# Altium PCB sheet4.PcbDoc (part 1 of 2)
Units mm, origin at the board's own origin, x right, y up, seen from the top; angles counter-clockwise.
Board outline 48.25 x 36 mm, 2 copper layers (Top Layer, Bottom Layer); 88 components, 96 nets, 433 pads, 91 vias.
Unrouted connection lines stored in the file: 251.
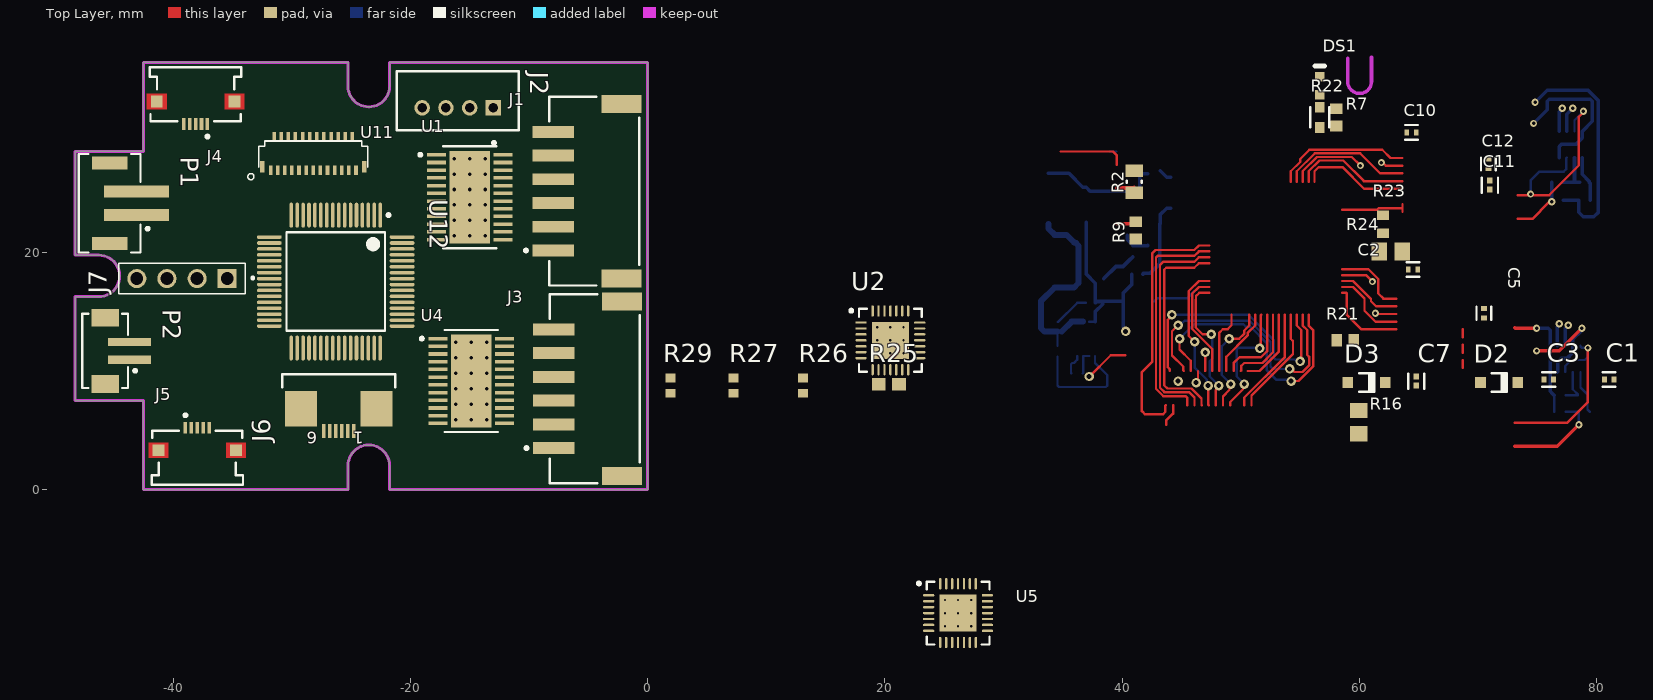
[diagram p0: Top Layer view]
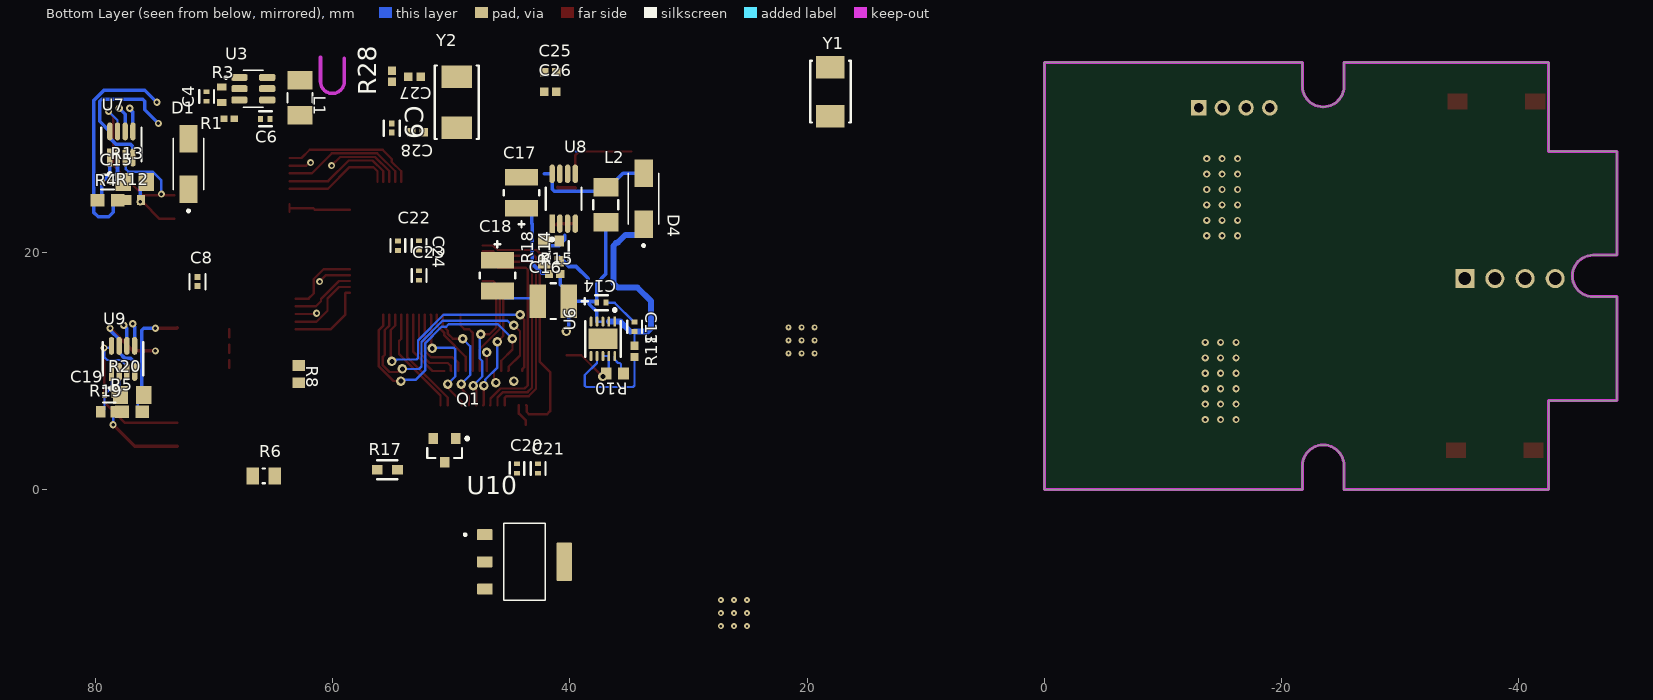
[diagram p1: Bottom Layer view, seen from below]

## Layer stack, top to bottom
Top Solder: solder mask 0.0102, Solder Resist, Dk 3.5
Top Layer: signal copper 0.0356
Dielectric 1: dielectric 0.32, FR-4, Dk 4.8
Bottom Layer: signal copper 0.0356
Bottom Solder: solder mask 0.0102, Solder Resist, Dk 3.5

## Board outline
-48.25,16.25 -46.25,16.25 ccw(c-46.25,18) -46.25,19.75 -48.25,19.75 -48.25,28.5 -42.5,28.5 -42.5,36 -25.25,36 -25.25,34 ccw(c-23.5,34) -21.75,34 -21.75,36 0,36 0,0 -21.75,0 -21.75,2 ccw(c-23.5,2) -25.25,2 -25.25,0 -42.5,0 -42.5,7.5 -48.25,7.5

## Design rules (kind name [scope] priority, off if disabled: settings)
Clearance [All] p1: gap=0.254 ignorepadtopadclearanceinfootprint=FALSE except(0: Arc-Hole Track-Hole SMDPad-Hole THPad-Hole Via-Hole Fill-Hole Poly-Hole Region-Hole Text-Hole)
MinimumSolderMaskSliver [All] p1 off: minsoldermaskwidth=0.254
PolygonConnect [All] p1: connectstyle=Relief reliefconductorwidth=0.254 reliefentries=4 polygonreliefangle="90 Angle" airgapwidth=0.254
RoutingVias [All] p1: holewidth=0.711 width=1.27 viastyle="Through Hole" minholewidth=0.711 minwidth=1.27 maxholewidth=0.711 maxwidth=1.27
SilkToSilkClearance [All] p1 off: silktosilkclearance=0.254
SilkToSolderMaskClearance [IsPad] p1 off: minsilkscreentomaskgap=0.254 clearancetoexposedcopper=TRUE
SolderMaskExpansion [All] p1: expansion=0.102 istentingtop=FALSE
Width [All] p1: maxlimit=0.254 minlimit=0.254 preferedwidth=0.254
27 further rules are at their usual default settings.

## Components (designator, comment, footprint, x,y, rotation, side; value= is the part's Value field where it differs from the comment)
C1 "GRM155R71C104KA88D" FP-GRM15-MFG 81.04,9.271 r0 top value=0.10μF
C2 "GRM155R71C104KA88D" FP-GRM15-MFG 64.516,18.542 r0 top value=0.10μF
C3 "GRM155R61A105KE15D" FP-GRM15-0_1-MFG 75.96,9.271 r0 top value=1uF
C4 "GRM155R71C104KA88D" FP-GRM15-MFG 70.612,33.128 r270 bottom value=0.10μF
C5 "GRM155R61A105KE15D" FP-GRM15-0_1-MFG 70.485,14.859 r270 top value=1uF
C6 "GRM155R71C104KA88D" FP-GRM15-MFG 65.659,31.242 r180 bottom value=0.10μF
C7 "GRM155R71E473KA88D" FP-GRM155-0_05-IPC_C 64.784,9.144 r90 top
C8 "GRM155R71E473KA88D" FP-GRM155-0_05-IPC_C 71.374,17.524 r90 bottom
C9 "GRM155R71E473KA88D" FP-GRM155-0_05-IPC_C 54.991,30.461 r90 bottom
C10 "GRM155R71C104KA88D" FP-GRM15-MFG 64.389,30.099 r180 top value=0.10μF
C11 "GRM155R71E473KA88D" FP-GRM155-0_05-IPC_C 70.993,25.654 r270 top
C12 "GRM155R71C104KA88D" FP-GRM15-MFG 70.866,27.43 r90 top value=0.10μF
C13 "GRM155R71C104KA88D" FP-GRM15-MFG 34.544,13.716 r270 bottom value=0.10μF
C14 "GRM155R71C104KA88D" FP-GRM15-MFG 37.338,15.748 r0 bottom value=0.10μF
C15 "GRM155R71C104KA88D" FP-GRM15-MFG 78.975,25.908 r0 bottom value=0.10μF
C16 "TAJB336K010RNJ" FP-TAJB-MFG 41.402,15.875 r180 bottom
C17 "TAJB336K010RNJ" FP-TAJB-MFG 44.069,25.019 r270 bottom
C18 "TAJB336K010RNJ" FP-TAJB-MFG 46.101,18.034 r90 bottom
C19 "GRM155R71C104KA88D" FP-GRM15-MFG 78.815,7.958 r0 bottom value=0.10μF
C20 "GRM155R71C104KA88D" FP-GRM15-MFG 44.45,1.778 r90 bottom value=0.10μF
C21 "GRM155R71C104KA88D" FP-GRM15-MFG 42.672,1.778 r90 bottom value=0.10μF
C22 "GRM155R71C104KA88D" FP-GRM15-MFG 54.483,20.555 r90 bottom value=0.10μF
C23 "GRM155R71C104KA88D" FP-GRM15-MFG 52.705,18.034 r90 bottom value=0.10μF
C24 "GRM155R71C104KA88D" FP-GRM15-MFG 52.705,20.574 r90 bottom value=0.10μF
C25 "CC0402JRNPO9BN220" CAPC1005X55X25ML05T05 41.656,35.179 r180 bottom
C26 "CC0402JRNPO9BN220" CAPC1005X55X25ML05T05 41.656,33.528 r180 bottom
C27 "CC0402JRNPO9BN220" CAPC1005X55X25ML05T05 53.086,34.798 r180 bottom
C28 "CC0402JRNPO9BN220" CAPC1005X55X25ML05T05 52.834,30.099 r180 bottom
D1 "1SMB5918BT3G" DIOM5226X220N 72.136,27.432 r90 bottom
D2 "1N4148W-7-F" DIOD-SOD123-2_V 71.769,9.017 r0 top
D3 "1N4148W-7-F" DIOD-SOD123-2_V 60.593,9.017 r0 top
D4 "1SMB5918BT3G" DIOM5226X220N 33.782,24.511 r90 bottom
DS1 "HSMH-C190" AVAG-HSMX-C190_V 56.642,34.036 r90 top
J1 "S6B-PH-SM4-TB(LF)(SN)" JST-S6B-PH-SM4-TB(LF)(SN)_V -5.08,25.146 r90 top
J2 "440054-4" FP-440054-4-MFG -16.002,32.766 r0 top
J3 "S6B-PH-SM4-TB(LF)(SN)" JST-S6B-PH-SM4-TB(LF)(SN)_V -5.034,8.493 r90 top
J4 "54548-0571" MOLX-54548-0571 -38.1,31.75 r180 top
J5 "54548-0571" MOLX-54548-0571 -37.957,4.257 r0 top
J6 "68710614522" 68710614522 -26.035,7.493 r180 top
J7 "PPTC041LFBN-RC" SULLINS_PPTC041LFBN-RC -39.243,17.78 r180 top
L1 "LB3218T220K" FP-LB3218-1_8-0_2-IPC_A 62.738,33.02 r270 bottom
L2 "LB3218T220K" FP-LB3218-1_8-0_2-IPC_A 36.957,24.003 r90 bottom
P1 "620302124022" 620302124022 -45.339,24.13 r270 top
P2 "679302124022" 679302124022 -45.72,11.684 r270 top
Q1 "NSS40201LT1G" ONSC-SOT-23-3-318-08_V 50.546,3.302 r270 bottom
R1 "RC0402FR-075K1L" RESC1005X40X25NL05T10 68.707,31.242 r0 bottom
R2 "CRCW08055K00FKTA" RESC2013X50X30NL20T20 41.021,25.941 r90 top
R3 "RC0603FR-072K7L" RESC1608X55X25LL10T15 69.342,33.274 r270 bottom
R4 "ERJ-3EKF3300V" RESC1608X55X30ML15T15#1 78.961,24.384 r180 bottom
R5 "ERJ-3EKF3300V" RESC1608X55X30ML15T15#1 76.891,6.561 r0 bottom
R6 "CRCW08055K00FKTA" RESC2013X50X30NL20T20 65.786,1.143 r180 bottom
R7 "ERJ-3EKF1501V" RESC1608X55X30ML15T15#2 58.039,31.369 r270 top
R8 "ERJ-3EKF1501V" RESC1608X55X30ML15T15#2 62.859,9.727 r270 bottom
R9 "ERJ-3EKF1501V" RESC1608X55X30ML15T15#2 41.148,21.844 r90 top
R10 "ERJ-3EKF1501V" RESC1608X55X30ML15T15#2 36.195,9.779 r180 bottom
R11 "MCMR04X300 JTL" RESC1005X40X25ML05T10 34.544,11.651 r90 bottom
R12 "CRCW06036K20JNEA" RESC1609X50X30LL10T20 76.708,24.384 r0 bottom
R13 "TNPW080510R0FEEA" RESC2013X55X40ML15T20 76.675,25.908 r180 bottom
R14 "RL0603FR-070R1L" FP-RL0603-0_55-MFG 40.894,20.099 r270 bottom
R15 "MCMR04X300 JTL" RESC1005X40X25ML05T10 41.275,18.161 r180 bottom
R16 "TNPW080510R0FEEA" RESC2013X55X40ML15T20 59.944,5.682 r90 top
R17 "RL0603FR-070R1L" FP-RL0603-0_55-MFG 55.372,1.651 r180 bottom
R18 "ERJ-3EKF3300V" RESC1608X55X30ML15T15#1 42.164,20.066 r90 bottom
R19 "CRCW0603300KFKEA" RESC1609X50X30NL10T20 78.923,6.561 r180 bottom
R20 "TNPW080510R0FEEA" RESC2013X55X40ML15T20 76.891,7.958 r180 bottom
R21 "ERJ-3EKF1003V" RESC1608X55X30ML15T15#2 58.801,12.573 r180 top
R22 "RL0603FR-070R1L" FP-RL0603-0_55-MFG 56.642,31.369 r90 top
R23 "RC0603FR-07100RL" RESC1608X55X25ML10T15 61.976,22.352 r270 top
R24 "TNPW080510R0FEEA" RESC2013X55X40ML15T20 62.644,20.066 r0 top
R25 "ERJ-3EKF3300V" RESC1608X55X30ML15T15#1 20.334,8.89 r0 top
R26 "ERJ3EKF1002V" RESC1609X55X30LL15T15 13.095,8.763 r90 top
R27 "ERJ3EKF1002V" RESC1609X55X30LL15T15 7.253,8.763 r90 top
R28 "MCMR04X300 JTL" RESC1005X40X25ML05T10 54.991,34.831 r90 bottom
R29 "ERJ3EKF1002V" RESC1609X55X30LL15T15 1.919,8.763 r90 top
U1 "DRV8873HPWPRQ1" FP-PWP0024J-MFG -14.986,24.638 r0 top
U2 "CP2102-GMR" SLAB-QFN-28-3125x3125TP_M 20.461,12.573 r0 top
U3 "MT3608" SOT95P280X145-6N 66.675,33.782 r180 bottom
U4 "DRV8873HPWPRQ1" FP-PWP0024J-MFG -14.859,9.144 r0 top
U5 "CP2102-GMR" SLAB-QFN-28-3125x3125TP_M 26.162,-10.414 r0 top
U6 "MCP73213-A6SI/MF" FP-C04-063-IPC_B 37.211,12.7 r270 bottom
U7 "INA219AIDCNR" FP-DCN0008A-IPC_B 77.795,29.079 r90 bottom
U8 "LM2623AMM/NOPB" FP-DGK0008A-IPC_B 40.513,24.511 r90 bottom
U9 "INA219AIDCNR" FP-DCN0008A-IPC_B 77.653,11.006 r90 bottom
U10 "AMS1117-3.3" SOT229P700X180-4N 43.815,-6.096 r180 bottom
U11 "" "25pin 0.3mm connector" -28.181,28.361 r0 top
U12 "STM32F103RCT7" STM-LQFP64_M -26.289,17.526 r270 top
Y1 "ABM3-8.000MHZ-D2Y-T" FP-ABM3-MFG 18.034,33.528 r90 bottom
Y2 "ABM7-32.000MHZ-D2Y-T" FP-ABM7-MFG 49.53,32.639 r90 bottom

## Footprints (in the part's own frame and the unit in brackets; to place one, negate y for a bottom-side part, rotate by r counter-clockwise, add the part's x,y. Pads: shape width x height; smd on the part's side, far side on the other; paste and mask are expansions set on the pad)
"25pin 0.3mm connector" [mm]
  rect 0.3x0.8 smd: 1(-3.6,-1.437) 3(-3,-1.437) 5(-2.4,-1.437) 7(-1.8,-1.437) 9(-1.2,-1.437) 11(-0.6,-1.437) 13(0,-1.437) 15(0.6,-1.437) 17(1.2,-1.437) 19(1.8,-1.437) 21(2.4,-1.437) 23(3,-1.437) 25(3.6,-1.437)
  rect 0.3x0.65 smd: 2(-3.3,1.438) 4(-2.7,1.438) 6(-2.1,1.438) 8(-1.5,1.438) 10(-0.9,1.438) 12(-0.3,1.438) 14(0.3,1.438) 16(0.9,1.438) 18(1.5,1.438) 20(2.1,1.438) 22(2.7,1.438) 24(3.3,1.438)
  rect 0.4x0.95 smd: P1(-4.3,-1.162) P2(4.3,-1.162)
  silkscreen extent -5.52,-2.25 4.6,1.01
68710614522 [mm] "ZIF Connectors, Horizontal, Bottom Contact, pitch 0.5mm, 6p"
  rect 0.3x1.2 smd: 1(-1.25,2.56) 2(-0.75,2.56) 3(-0.25,2.56) 4(0.25,2.56) 5(0.75,2.56) 6(1.25,2.56)
  rect 2.7x3 smd: MP1(-3.18,0.7) MP2(3.18,0.7)
  silkscreen extent -4.77,-2.22 4.77,-1.12, body extent -4.7,-2.15 4.7,2.95, height 2.1
620302124022 [mm] "2.00mm SMT Male Vertical Shrouded Header, 2p"
  rect 1x5.5 smd: 1(1,2.25) 2(-1,2.25)
  rect 1.1x3 smd: MP1(-3.4,0) MP2(3.4,0)
  silkscreen extent -4.15,-2.6 4.15,3.32, body extent -4,-2.5 4,4.51, height 6.77
679302124022 [mm] "1.50mm SMT Male Vertical Shrouded Header, 2p"
  rect 0.7x3.6 smd: 1(0.75,2.05) 2(-0.75,2.05)
  rect 1.5x2.3 smd: MP1(-2.8,0) MP2(2.8,0)
  silkscreen extent -3.13,-1.92 3.13,2.65, body extent -3,-1.85 3,3.35, height 5.49
AVAG-HSMX-C190_V [mm] "SMD, 2-Leads, Body 1.6x0.8mm, Height 0.9mm"
  rect 0.8x0.8 smd: 1(-0.75,0) 2(0.75,0)
  silkscreen extent 1.65,-0.4 1.65,0.4, body extent -0.8,-0.4 0.8,0.4, height 0.9
CAPC1005X55X25ML05T05 [mm] "Chip Capacitor, 2-Leads, Body 1.00x0.50mm, IPC Low Density"
  rect 0.72x0.72 smd: 1(-0.51,0) 2(0.51,0)
  body extent -0.53,-0.28 0.53,0.27, height 0.55
DIOD-SOD123-2_V [mm] "SOD123, 2-Leads, Body 2.7x1.55mm, Height 1.45mm"
  rect 0.9x0.95 smd: 1(-1.575,0) 2(1.575,0)
  silkscreen extent -0.64,-0.82 0.64,0.77, body extent -1.35,-0.77 1.35,0.77, height 1.45
DIOM5226X220N [mm]
  rect 2.32x1.55 smd: A(2.14,0) C(-2.14,0)
  silkscreen extent -4.05,-1.3 2.16,1.3
FP-440054-4-MFG [mm]
  rect 1.3x1.3 hole 0.8 paste-1000 mask+0: 1(3,-0.6)
  round 1.3 hole 0.8 paste-1000 mask+0: 2(1,-0.6) 3(-1,-0.6) 4(-3,-0.6)
  silkscreen extent -5.15,-3.67 5.15,2.5, body extent -5.25,-2.6 5.25,2.6, height 0.25
FP-ABM3-MFG [mm]
  rect 1.9x2.4 smd paste+0 mask+0: 1(-2.05,0) 2(2.05,0)
  silkscreen extent -2.6,-1.7 2.6,1.7, body extent -2.5,-1.6 2.5,1.6, height 1.3
FP-ABM7-MFG [mm]
  rect 1.9x2.6 smd paste+0 mask+0: 1(-2.15,0) 2(2.15,0)
  silkscreen extent -3.1,-1.85 3.1,1.85, body extent -3,-1.75 3,1.75, height 1.4
FP-C04-063-IPC_B [mm]
  rect 0.854x0.239 smd paste+0 mask+0: 1(-1.452,1)
  rrect100% 0.854x0.239 smd paste+0 mask+0: 2(-1.452,0.5) 3(-1.452,0) 4(-1.452,-0.5) 5(-1.452,-1) 6(1.452,-1) 7(1.452,-0.5) 8(1.452,0) 9(1.452,0.5) 10(1.452,1)
  rect 1.75x2.45 smd paste-1000 mask+0: 11(0,0)
  silkscreen extent -2.55,-1.5 1.5,1.5
FP-DCN0008A-IPC_B [mm]
  rect 1.505x0.455 smd paste+0 mask+0: 1(-1.1,0.975)
  rrect100% 1.505x0.455 smd paste+0 mask+0: 2(-1.1,0.325) 3(-1.1,-0.325) 4(-1.1,-0.975) 5(1.1,-0.975) 6(1.1,-0.325) 7(1.1,0.325) 8(1.1,0.975)
  silkscreen extent -2.62,-1.7 1.4,1.7, body extent -1.4,-1.45 1.4,1.45, height 1.45
FP-DGK0008A-IPC_B [mm]
  rect 1.557x0.458 smd paste+0 mask+0: 1(-2.101,0.975)
  rrect100% 1.557x0.458 smd paste+0 mask+0: 2(-2.101,0.325) 3(-2.101,-0.325) 4(-2.101,-0.975) 5(2.101,-0.975) 6(2.101,-0.325) 7(2.101,0.325) 8(2.101,0.975)
  silkscreen extent -3.55,-1.5 0.95,1.5, body extent -2.45,-1.5 2.45,1.5, height 1.1
FP-GRM15-0_1-MFG [mm]
  rect 0.4x0.5 smd paste+0 mask+0: 1(-0.4,0) 2(0.4,0)
  silkscreen extent -0.55,-0.63 0.55,0.63, body extent -0.7,-0.38 0.7,0.38, height 0.25
FP-GRM15-MFG [mm]
  rect 0.4x0.5 smd paste+0 mask+0: 1(-0.4,0) 2(0.4,0)
  silkscreen extent -0.53,-0.63 0.53,0.63, body extent -0.7,-0.38 0.7,0.38, height 0.25
FP-GRM155-0_05-IPC_C [mm]
  rect 0.515x0.472 smd paste+0 mask+0: 1(-0.379,0) 2(0.379,0)
  silkscreen extent -0.64,-0.67 0.64,0.67, body extent -0.74,-0.38 0.74,0.38, height 0.25
FP-LB3218-1_8-0_2-IPC_A [mm]
  rect 1.555x2.106 smd paste+0 mask+0: 1(-1.476,0) 2(1.476,0)
  silkscreen extent -0.4,-1.05 0.4,1.05, body extent -1.6,-0.9 1.6,0.9, height 2
FP-PWP0024J-MFG [mm]
  rect 1.6x0.3 smd paste-1000 mask+0: 1(-2.8,3.575) 2(-2.8,2.925) 3(-2.8,2.275) 4(-2.8,1.625) 5(-2.8,0.975) 6(-2.8,0.325) 7(-2.8,-0.325) 8(-2.8,-0.975) 9(-2.8,-1.625) 10(-2.8,-2.275) 11(-2.8,-2.925) 12(-2.8,-3.575) 13(2.8,-3.575) 14(2.8,-2.925) 15(2.8,-2.275) 16(2.8,-1.625) 17(2.8,-0.975) 18(2.8,-0.325) 19(2.8,0.325) 20(2.8,0.975) 21(2.8,1.625) 22(2.8,2.275) 23(2.8,2.925) 24(2.8,3.575)
  rect 3.4x7.8 smd paste-1000 mask-1000: 25(0,0)
  silkscreen extent -4.3,-4.3 2.25,4.3, body extent -3.7,-4.2 3.7,4.2, height 0.25
FP-RL0603-0_55-MFG [mm]
  rect 0.9x0.8 smd paste+0 mask+0: 1(-0.85,0) 2(0.85,0)
  silkscreen extent -0.85,-0.8 0.85,0.8, body extent -0.8,-0.4 0.8,0.4, height 0.55
FP-TAJB-MFG [mm]
  rect 1.4x2.8 smd paste+0 mask+0: 1(-1.3,0) 2(1.3,0)
  silkscreen extent -0.23,-1.5 2.9,1.5, body extent -1.75,-1.4 1.75,1.4, height 2.1
JST-S6B-PH-SM4-TB(LF)(SN)_V [mm] "SMD, 2-Leads, Body 15.9x7.6mm, Pitch 2mm"
  rect 1x3.5 smd: 1(-5,2.875) 2(-3,2.875) 3(-1,2.875) 4(1,2.875) 5(3,2.875) 6(5,2.875)
  rect 1.5x3.4 smd: MP1(-7.35,-2.875) MP2(7.35,-2.875)
  silkscreen extent -7.95,-4.37 7.95,5.3, body extent -7.95,-4.37 7.95,4.23, height 5.6
MOLX-54548-0571 [mm] "FPC Connector, 5-Leads, Right Angle, Pitch 0.5 mm, Mated Height 1.2 mm, SMT"
  rect 0.3x1 smd: 1(-1,0.95) 2(-0.5,0.95) 3(0,0.95) 4(0.5,0.95) 5(1,0.95)
  rect 1x1 smd: MP1(-3.275,-0.95) MP2(3.275,-0.95)
  Top Layer region: 4.1,-0.3 2.45,-0.3 2.45,-1.6 4.1,-1.6
  Top Layer region: -4.1,-0.3 -2.45,-0.3 -2.45,-1.6 -4.1,-1.6
  silkscreen extent -3.85,-3.85 3.85,2.13, body extent -3.85,-3.85 3.85,1.15, height 1.21
ONSC-SOT-23-3-318-08_V [mm] "SOT23, 3-Leads, Body 2.92x1.3mm, Pitch 0.95mm"
  rect 0.9x0.8 smd: 1(-1,0.95) 2(-1,-0.95) 3(1,0)
  silkscreen extent -1.12,-1.46 0.65,2.02, body extent -0.65,-1.46 0.65,1.46, height 1.11
RESC1005X40X25ML05T10 [mm] "Chip Resistor, 2-Leads, Body 1.00x0.50mm, IPC Low Density"
  rect 0.7x0.65 smd: 1(-0.475,0) 2(0.475,0)
  body extent -0.53,-0.27 0.53,0.28, height 0.4
RESC1005X40X25NL05T10 [mm] "Chip Resistor, 2-Leads, Body 1.00x0.50mm, IPC Medium Density"
  rect 0.6x0.55 smd: 1(-0.425,0) 2(0.425,0)
  body extent -0.53,-0.27 0.53,0.28, height 0.4
RESC1608X55X25LL10T15 [mm] "Chip Resistor, 2-Leads, Body 1.60x0.80mm, IPC High Density"
  rect 0.6x0.8 smd: 1(-0.65,0) 2(0.65,0)
  body extent -0.85,-0.45 0.85,0.45, height 0.55
RESC1608X55X25ML10T15 [mm] "Chip Resistor, 2-Leads, Body 1.60x0.80mm, IPC Low Density"
  rect 0.8x1 smd: 1(-0.75,0) 2(0.75,0)
  body extent -0.85,-0.45 0.85,0.45, height 0.55
RESC1608X55X30ML15T15#1 [mm] "Chip Resistor, 2-Leads, Body 1.75x0.95mm, IPC Low Density"
  rect 1.15x1.05 smd: 1(-0.85,0) 2(0.85,0)
  body extent -0.87,-0.48 0.87,0.48, height 0.55
RESC1608X55X30ML15T15#2 [mm] "Chip Resistor, 2-Leads, Body 1.60x0.80mm, IPC Low Density"
  rect 0.9x1.05 smd: 1(-0.725,0) 2(0.725,0)
  body extent -0.87,-0.48 0.87,0.48, height 0.55
RESC1609X50X30LL10T20 [mm] "Chip Resistor, 2-Leads, Body 1.55x0.85mm, IPC High Density"
  rect 0.7x0.85 smd: 1(-0.575,0) 2(0.575,0)
  body extent -0.82,-0.48 0.82,0.48, height 0.5
RESC1609X50X30NL10T20 [mm] "Chip Resistor, 2-Leads, Body 1.55x0.85mm, IPC Medium Density"
  rect 0.8x0.95 smd: 1(-0.625,0) 2(0.625,0)
  body extent -0.82,-0.48 0.82,0.48, height 0.5
RESC1609X55X30LL15T15 [mm] "Chip Resistor, 2-Leads, Body 1.75x0.95mm, IPC High Density"
  rect 0.75x0.85 smd: 1(-0.65,0) 2(0.65,0)
  body extent -0.87,-0.48 0.87,0.48, height 0.55
RESC2013X50X30NL20T20 [mm] "Chip Resistor, 2-Leads, Body 2.00x1.25mm, IPC Medium Density"
  rect 1.05x1.45 smd: 1(-0.925,0) 2(0.925,0)
  silkscreen extent -0.1,-0.63 0.1,0.63, body extent -1.1,-0.72 1.1,0.72, height 0.5
RESC2013X55X40ML15T20 [mm] "Chip Resistor, 2-Leads, Body 2.00x1.25mm, IPC Low Density"
  rect 1.3x1.5 smd: 1(-0.975,0) 2(0.975,0)
  body extent -1.07,-0.7 1.08,0.7, height 0.55
SLAB-QFN-28-3125x3125TP_M [mm] "QFN, 28-Leads, Body 5x5mm, Pitch 0.5mm, Thermal Pad 3.13x3.13mm, IPC Low Density"
  oval 0.95x0.2 smd: 1(-2.475,1.5) 2(-2.475,1) 3(-2.475,0.5) 4(-2.475,0) 5(-2.475,-0.5) 6(-2.475,-1) 7(-2.475,-1.5) 15(2.475,-1.5) 16(2.475,-1) 17(2.475,-0.5) 18(2.475,0) 19(2.475,0.5) 20(2.475,1) 21(2.475,1.5)
  oval 0.2x0.95 smd: 8(-1.5,-2.475) 9(-1,-2.475) 10(-0.5,-2.475) 11(0,-2.475) 12(0.5,-2.475) 13(1,-2.475) 14(1.5,-2.475) 22(1.5,2.475) 23(1,2.475) 24(0.5,2.475) 25(0,2.475) 26(-0.5,2.475) 27(-1,2.475) 28(-1.5,2.475)
  rect 3.13x3.13 smd: 29(0,0)
  silkscreen extent -3.42,-2.65 2.65,2.65, body extent -2.5,-2.5 2.5,2.5, height 1
SOT95P280X145-6N [mm]
  rrect50% 1.37x0.59 smd: 1(-1.17,0.95) 2(-1.17,0) 3(-1.17,-0.95) 4(1.17,-0.95) 5(1.17,0) 6(1.17,0.95)
  silkscreen extent -2.4,-1.57 0.85,1.57, body extent -1.45,-1.4 1.45,1.4, height 1.45
SOT229P700X180-4N [mm]
  rrect15% 1.31x0.93 smd: 1(-3.345,2.29) 2(-3.345,0) 3(-3.345,-2.29)
  rrect15% 1.31x3.24 smd: 4(3.345,0)
  silkscreen extent -5.1,-3.25 1.75,3.25, body extent -3.5,-3.25 3.5,3.25, height 1.8
STM-LQFP64_M [mm] "Thin QFP, 64-Leads, Body 10x10mm, Pitch 0.5mm, IPC Low Density"
  oval 2.1x0.3 smd: 1(-5.6,3.75) 2(-5.6,3.25) 3(-5.6,2.75) 4(-5.6,2.25) 5(-5.6,1.75) 6(-5.6,1.25) 7(-5.6,0.75) 8(-5.6,0.25) 9(-5.6,-0.25) 10(-5.6,-0.75) 11(-5.6,-1.25) 12(-5.6,-1.75) 13(-5.6,-2.25) 14(-5.6,-2.75) 15(-5.6,-3.25) 16(-5.6,-3.75) 33(5.6,-3.75) 34(5.6,-3.25) 35(5.6,-2.75) 36(5.6,-2.25) 37(5.6,-1.75) 38(5.6,-1.25) 39(5.6,-0.75) 40(5.6,-0.25) 41(5.6,0.25) 42(5.6,0.75) 43(5.6,1.25) 44(5.6,1.75) 45(5.6,2.25) 46(5.6,2.75) 47(5.6,3.25) 48(5.6,3.75)
  oval 0.3x2.1 smd: 17(-3.75,-5.6) 18(-3.25,-5.6) 19(-2.75,-5.6) 20(-2.25,-5.6) 21(-1.75,-5.6) 22(-1.25,-5.6) 23(-0.75,-5.6) 24(-0.25,-5.6) 25(0.25,-5.6) 26(0.75,-5.6) 27(1.25,-5.6) 28(1.75,-5.6) 29(2.25,-5.6) 30(2.75,-5.6) 31(3.25,-5.6) 32(3.75,-5.6) 49(3.75,5.6) 50(3.25,5.6) 51(2.75,5.6) 52(2.25,5.6) 53(1.75,5.6) 54(1.25,5.6) 55(0.75,5.6) 56(0.25,5.6) 57(-0.25,5.6) 58(-0.75,5.6) 59(-1.25,5.6) 60(-1.75,5.6) 61(-2.25,5.6) 62(-2.75,5.6) 63(-3.25,5.6) 64(-3.75,5.6)
  silkscreen extent -5.72,-4.15 4.15,4.58, body extent -5,-5 5,5, height 1.6
SULLINS_PPTC041LFBN-RC [mm]
  rect 1.605x1.605 / inner round 1.605 / far side rect 1.605x1.605 hole 1.07: 1(-3.81,0)
  round 1.605 hole 1.07: 2(-1.27,0) 3(1.27,0) 4(3.81,0)
  silkscreen extent -6.06,-1.27 5.33,1.27, body extent -5.33,-1.27 5.33,1.27, height 8.51

## Part data
C1 C2 C4 C6 C10 C12 C13 C14 C15 C19 C20 C21 C22 C23 C24: library part CMP-2100-03641-2, "CAP CER 0.1UF 16V X7R 0402", Capacitance=0.10μF, Manufacturer=Murata, Package=GRM15, Temperature="-55°C to +125°C", Temperature Characteristic=X7R, Temperature Range High=+125°C, Temperature Range Low=-55°C, Tolerance=10%, Voltage Rating=16Vdc, Category=Cap, ComponentLink2Description=Datasheet, ComponentLink2URL=https://search.murata.co.jp/Ceramy/image/img/A01X/G101/ENG/GRM155R71H471KA01-01A.pdf, Device Class L1="Passive Components", Device Class L2=Capacitors, Device Class L3="Ceramic Capacitors", Digikey Description="CAP CER 0.1UF 16V X7R 0402", Height=0.55mm, Ipc Land Pattern Name=CAPC10050X219, Lead Free=yes, Manufacturer Part Number=GRM155R71C104KA88D, Material=Ceramic, Mouser Description="0402 0.1 uF 16V ±10 % Tolerance X7R SMT Multilayer Ceramic Capacitor", Octopart=https://octopart.com/grm155r71c104ka88d-murata-196880, RoHS=TRUE, Standoff Height=0mm
C3 C5: library part CMP-2008-04556-2, "CAP CER 1UF 10V X5R 0402", Capacitance=1uF, Manufacturer=Murata, Package=GRM15-0.1, Temperature="-55°C to +85°C", Temperature Characteristic=X5R, Temperature Coefficient=15%, Temperature Range High=+85°C, Temperature Range Low=-55°C, Tolerance=10%, Voltage Rating=10V, Automotive=No, Category=Cap, ComponentLink2Description=Datasheet, ComponentLink2URL=https://search.murata.co.jp/Ceramy/image/img/A01X/G101/ENG/GRM155R61A105KE15-01A.pdf, Device Class L1="Passive Components", Device Class L2=Capacitors, Device Class L3="Ceramic Capacitors", Digikey Description="CAP CER 1UF 10V X5R 0402", Height=0.55mm, Ipc Land Pattern Name=CAPC10050X50, Lead Free=Yes, Manufacturer Part Number=GRM155R61A105KE15D, Material=Ceramic, Mouser Description="0402 1 uF 10 V ±10% Tolerance X5R Surface Mount Multilayer Ceramic Capacitor", Octopart=https://octopart.com/grm155r61a105ke15d-murata-197442, RoHS=TRUE
C7 C8 C9 C11: library part CMP-2008-04630-5, "Chip Multilayer Ceramic Capacitors for General Purpose, 0402, 47000pF, X7R, 15%, 10%, 25V", Capacitance=47nF, Case Code (Imperial)=0402, Case Code (Metric)=1005, Dielectric=X7R, Max Operating Temperature=125°C, Min Operating Temperature=-55°C, Package Quantity=1, Tolerance=10%, Voltage=25V, Case/Package=0402, Depth=0.5mm, Height=0.5mm, Lead Free="Lead Free", Length=1mm, Material=Ceramic, Mount="Surface Mount", Number of Pins=2, Packaging="Tape and Reel", Radiation Hardening=No, REACH SVHC="No SVHC", Termination=SMD/SMT, Thickness=0.022inch, Voltage Rating=25V, Voltage Rating (DC)=25V, Width=0.02inch
C16 C18: library part CMP-04424-000596-1, "22uF 10V  ±10% 1.8Ω 1210  SMD Tantalum Capacitor", Capacitance=33uF, Case Code (Imperial)=1210, Case Code (Metric)=3528, Dielectric Material=Tantalum, ESR (Equivalent Series Resistance)=1.8R, Leakage Current=3.3uA, Max Operating Temperature=125°C, Min Operating Temperature=-55°C, Package Quantity=1, Tolerance=10%, Voltage=10V, Case/Package=1210, Construction=Flat, Depth=2.8mm, Dissipation Factor=6%, Features="General Purpose", Height=1.9mm, Height - Seated (Max)=0.083inch, Lead Free="Lead Free", Lead Pitch=1.4mm, Length=3.5mm, Mount="Surface Mount", Number of Pins=2, Packaging="Tape and Reel", Polarity=Polar, Radiation Hardening=No, REACH SVHC="No SVHC", RoHS Compliant=Yes, Series=TAJ, Termination=SMD/SMT, Voltage Rating=10V, Voltage Rating (DC)=10V, Width=2.8mm
C17: library part CMP-04424-000596-1, "4.7uF 10V  ±10% 1.8Ω 1210  SMD Tantalum Capacitor", Capacitance=33uF, Case Code (Imperial)=1210, Case Code (Metric)=3528, Dielectric Material=Tantalum, ESR (Equivalent Series Resistance)=1.8R, Leakage Current=3.3uA, Max Operating Temperature=125°C, Min Operating Temperature=-55°C, Package Quantity=1, Tolerance=10%, Voltage=10V, Case/Package=1210, Construction=Flat, Depth=2.8mm, Dissipation Factor=6%, Features="General Purpose", Height=1.9mm, Height - Seated (Max)=0.083inch, Lead Free="Lead Free", Lead Pitch=1.4mm, Length=3.5mm, Mount="Surface Mount", Number of Pins=2, Packaging="Tape and Reel", Polarity=Polar, Radiation Hardening=No, REACH SVHC="No SVHC", RoHS Compliant=Yes, Series=TAJ, Termination=SMD/SMT, Voltage Rating=10V, Voltage Rating (DC)=10V, Width=2.8mm
C25 C26 C27 C28: library part CMP-2100-03590-1, "Chip Capacitor, 22 pF, +/- 5%, 50 V, -55 to 125 degC, 0402 (1005 Metric), RoHS, Tape and Reel", Capacitance=22pF, Case Code (Imperial)=0402, Case Code (Metric)=1005, Dielectric=C0G, Dielectric Material=Ceramic, Insulation Resistance=100GR, Manufacturer=Yageo, Max Operating Temperature=125degC, Min Operating Temperature=-55degC, Package Description="2-Pin Surface Mount Device, Body 1 x 0.5 mm", Package Quantity=1, Temperature Coefficient=30ppm/degC, Tolerance=5%, Voltage Rating=50V, Case/Package=0402, Composition=Ceramic, Datasheet URL=http://www.yageo.com/NewPortal/yageodocoutput?fileName=/pdf/MLCC/UPY-GP_NP0_16V-to-50V_14.pdf, Datasheet Version="Rev. 14, 07/2016", Depth=0.5mm, Height=0.5mm, Lead Free=LeadFree, Length=1mm, Manufacturer URL=http://www.yageo.com/, Mount=SurfaceMount, Number of Pins=2, Package Reference=0402, Packaging=TapeandReel, Radiation Hardening=No, REACH SVHC=NoSVHC, RoHSCompliant=True, Termination=SMD/SMT, Thickness=0.022inch, Voltage Rating (DC)=50V, Width=0.02inch
D1: "Zener Diode 12.1V 3W Â±5% Surface Mount SMB", Package="DO-214 ON Semiconductor", Arrow_Electronics-Purchase-URL=https://snapeda.com/shop?store=Arrow+Electronics&id=475871, Availability=Good, DigiKey-Purchase-URL=https://snapeda.com/shop?store=DigiKey&id=475871, MF="ON Semiconductor", Mouser-Purchase-URL=https://snapeda.com/shop?store=Mouser&id=475871, MP=1SMB5918BT3G, Price=None, SnapEDA_Link=https://www.snapeda.com/parts/1SMB5918BT3G/ON%20Semiconductor/view-part/475871/?ref=snap
D2 D3: library part CMP-2000-04932-2, "Fast Switching Diode, 100 V, 0.15 A, -65 to 150 degC, 2-Pin?SOD123, RoHS, Tape and Reel", If - Forward Current=0.15A, Ir - Reverse Current=1uA, Manufacturer=DiodesIncorporated, Max Surge Current=2A, Maximum Operating Temperature=+150C, Minimum Operating Temperature=-65C, Operating Temperature Range=-65Cto+150C, Package / Case=SOD-123, Package Reference=SOD123-2, Peak Reverse Voltage=100V, Vf - Forward Voltage=1.25V, Brand=DiodesIncorporated, Configuration=Single, Datasheet URL=http://www.farnell.com/datasheets/1915529.pdf, Datasheet Version="Rev. 24-2, 10/2013", Factory Pack Quantity=3000, Height=1.25mm, Length=2.85mm, Manufacturer URL=http://www.diodes.com/, Mounting Style=SMD/SMT, Package URL=http://www.diodes.com/datasheets/ds18004.pdf, Packaging=Reel, Product=SwitchingDiodes, Product Category=Diodes-GeneralPurpose,Power,Switching, Recovery Time=4ns, RoHS=True, Series=1N4148, Type=SwitchingDiode, Unit Weight=0.000353oz, Width=1.7mm
D4: "Zener Diode 5.1V 3W Â±5% Surface Mount SMB", Package="DO-214 ON Semiconductor", Arrow_Electronics-Purchase-URL=https://snapeda.com/shop?store=Arrow+Electronics&id=475871, Availability=Good, DigiKey-Purchase-URL=https://snapeda.com/shop?store=DigiKey&id=475871, MF="ON Semiconductor", Mouser-Purchase-URL=https://snapeda.com/shop?store=Mouser&id=475871, MP=1SMB5918BT3G, Price=None, SnapEDA_Link=https://www.snapeda.com/parts/1SMB5918BT3G/ON%20Semiconductor/view-part/475871/?ref=snap
DS1: library part CMP-1744-00004-1, "LED Uni-Color Red, 65 mW, 20 mA, -40 to 85 degC, 2-Pin SMD, RoHS, Tape and Reel", Current Rating="1 A", Max Operating Temperature="85 degC", Min Operating Temperature="-30 degC", Package Quantity=2000, ComponentLink1Description="Manufacturer URL", ComponentLink1URL=http://www.avagotech.com/, ComponentLink2Description=Datasheet, ComponentLink2URL=http://docs.avagotech.com/docs/AV02-0551EN, ComponentLink3Description="Package Specification", ComponentLink3URL=http://www.fairchildsemi.com/dwg/MA/MA03D.pdf, Connector Type=USB, Contact Material=Copper, Contact Plating=Gold, DatasheetVersion=Mar-12, Gender=Male, Height="2.8 mm", Lead Pitch="0.65 mm", Length="7.5 mm", Mount="Surface Mount", PackageDescription="2-Pin Surface Mount Device, Body 1.6 x 0.8 mm, Height 0.9 mm", PackageReference=HSMX-C190, Packaging="Tape and Reel", Pins=5, REACH SVHC="No SVHC", RoHSCompliant=true, Width="5.6 mm"
J1 J3: library part CMP-2000-07027-1, "Male Header, Pitch 2 mm, 1 x 6 Position, Height 5.5 mm, -25 to 85 degC", Manufacturer=JST, Package Description="Male Header, Pitch 2 mm, 1 x 6 Position, Height 5.5 mm", Datasheet URL=https://datasheet.ciiva.com/11747/0900766b80df0d9d-11747278.pdf, Datasheet Version=11/2008, Manufacturer URL=http://www.jst.com/home2.html, Mounting Technology=SurfaceMount, No of Positions=6, Package Reference=S6B-PH-SM4-TB(LF)(SN), Pitch=2mm, Style/Orientation=RightAngleHeader/Plug, Termination=Solder, Type=ShroudedHeader
J2: library part CMP-03369-000004-1, "CONN HEADER VERT 4POS 2MM", Current Rating=3A, Manufacturer=TE, Temperature="-25°C to +85°C", Temperature Range High=+85°C, Temperature Range Low=-25°C, Voltage Rating=250V, Automotive=No, Category=Conn, ComponentLink2Description=Datasheet, ComponentLink2URL=https://www.te.com/usa-en/product-440054-4.datasheet.pdf, Conn Gender=Male, Conn Orientation=Vertical, Contact Material=Tin,Nickel, Device Class L1=Connectors, Device Class L2="Headers and Wire Housings", Device Class L3=unset, Digikey Description="CONN HEADER VERT 4POS 2MM", Footprint Url=https://www.te.com/commerce/DocumentDelivery/DDEController?Action=showdoc&DocId=Customer+Drawing%7F440054%7FF6%7Fpdf%7FEnglish%7FENG_CD_440054_F6.pdf%7F440054-4, Height=6.35mm, Lead Free=Yes, Manufacturer Part Number=440054-4, Mouser Description="HPI Series; 2mm Pitch 4 Way 1 Row Straight PCB Header; Solder Termination; 3A", Number Of Contacts=4, Number of Rows=1, Octopart=https://octopart.com/440054-4-te+connectivity-40072882, Package=440054-4, Pitch=2mm, RoHS=TRUE
J4 J5: library part CMP-1241-00539-1, "0.5 mm Pitch Easy-On(TM) Type FPC Connector, 1.2 mm Mated Height, Right Angle, ZIF, SMT, Bottom Contact, 5 Circuits, -20 to 85 degC, ELV and RoHS Compliant, Tape and Reel", Current (Max per Contact)=0.5A, Manufacturer=Molex, Voltage (Max)=50V, Circuits (Loaded)=5, ComponentLink1Description="Manufacturer URL", ComponentLink1URL=http://www.molex.com/molex/index.jsp, ComponentLink2Description=Datasheet, ComponentLink2URL=http://www.molex.com/webdocs/datasheets/pdf/en-us/0545480571_FFC_FPC_CONNECTORS.pdf, ComponentLink3Description="Package Specification", ComponentLink3URL=http://www.molex.com/pdm_docs/sd/545480571_sd.pdf, Contact Position=Bottom, Durability (mating cycles max)=20, Entry Angle="90degrees Angle", Mated Height=1.20mm, Material - Metal="Phosphor Bronze", Material - Plating Mating=Gold, Material - Plating Termination=Tin, Mounting Technology="Surface Mount", Number of Rows=1, Orientation="Right Angle", PackageDescription="5-Lead FPC Connector, Pitch 0.5 mm", PackageReference=54548-0571, PackageVersion="Rev. N, 06/2008", Packing="Tape and Reel", PartNumber=54548-0571, PCB Locator=No, PCB Retention=Yes, Pitch - Mating Interface=0.50mm, Polarized to PCB=Yes, RoHS=TRUE, Stackable=No
J6: library part CMP-1502-01527-1, "SMT ZIF Connectors WR-FPC, Horizontal, Bottom Contact, pitch 0.5 mm, 6 pins", Contact Resistance=20mOhm, Manufacturer="Wurth Elektronik", Operating Temperature=-25to85degC, Rated Current=0.5A, Withstanding Voltage=250VAC, Working Voltage=50VAC, Contact Design=BottomContact, Datasheet URL=https://katalog.we-online.de/em/datasheet/68710614522.pdf, Manufacturer URL=http://www.we-online.de, Mounting Technology=SMT, Orientation=Horizontal, Package Reference=68710614522, Packaging=TapeandReel, Part Number=68710614522, Pin Number=6, Pitch=0.5mm, Publisher=WurthElektronik
J7: "4 Position Header Connector 0.100 (2.54mm) Through Hole Tin", Package=None, Check_prices=https://www.snapeda.com/parts/PPTC041LFBN-RC/Sullins+Connector+Solutions/view-part/?ref=eda, Digi-Key_Part_Number=S7002-ND, MF="Sullins Connector", MP=PPTC041LFBN-RC, Purchase-URL=https://pricing.snapeda.com/search/part/PPTC041LFBN-RC/?ref=eda, SnapEDA_Link=https://www.snapeda.com/parts/PPTC041LFBN-RC/Sullins+Connector+Solutions/view-part/?ref=snap
L1 L2: library part CMP-14484-000643-1, "SMD Inductors 22uH ±10% 0.255A 0.637Ω 1207", Case Code (Imperial)=1207, Case Code (Metric)=3218, Current Rating=255mA, DC Resistance (DCR)=490mR, Inductance=22uH, Max Operating Temperature=105°C, Min Operating Temperature=-40°C, Package Quantity=2000, Resistor Type=Wirewound, Self Resonant Frequency=19MHz, Test Frequency=2.52MHz, Tolerance=10%, Case/Package=1207, Core Material=Ferrite, DC Current=255mA, Depth=2mm, Halogen Free="Halogen Free", Height=1.8mm, Height - Seated (Max)=0.08inch, Lead Free="Lead Free", Length=3.2mm, Max DC Current=255mA, Military Standard=Not, Mount="Surface Mount", Number of Pins=2, Packaging="Tape and Reel", Radiation Hardening=No, RoHS Compliant=Yes, Series=LB, Shielding=Unshielded, Termination=SMD/SMT, Width=0.071inch
P1: library part CMP-1502-00660-1, "Male Shrouded Header WR-WTB, SMT, Vertical, pitch 2 mm, 1 x 2 position", Contact Resistance=20mOhm, Manufacturer="Wurth Elektronik", Operating Temperature=-25to85degC, Working Voltage=100VAC, Datasheet URL=https://katalog.we-online.de/em/datasheet/6203xx124022.pdf, Gender=Male, Manufacturer URL=http://www.we-online.de, Mounting Technology=SMT, Orientation=Vertical, Package Reference=620302124022, Packaging=TapeandReel, Part Number=620302124022, Pitch=2mm, Position=1x2, Publisher=WurthElektronik
P2: library part CMP-1502-00721-1, "Male Shrouded Header WR-WTB, SMT, Vertical, pitch 1.5 mm, 1 x 2 position", Contact Resistance=20mOhm, Manufacturer="Wurth Elektronik", Operating Temperature=-25to85degC, Working Voltage=50VAC, Datasheet URL=https://katalog.we-online.de/em/datasheet/6793xx124022.pdf, Gender=Male, Manufacturer URL=http://www.we-online.de, Mounting Technology=SMT, Orientation=Vertical, Package Reference=679302124022, Packaging=TapeandReel, Part Number=679302124022, Pitch=1.5mm, Position=1x2, Publisher=WurthElektronik
Q1: library part CMP-1048-00730-1, "40 V, 2 A, Low VCE(sat), NPN Transistor, 3-Pin SOT-23, Pb-Free, Tape and Reel", Manufacturer="On Semiconductor", ComponentLink1Description="Manufacturer URL", ComponentLink1URL=http://www.onsemi.com/, ComponentLink2Description=Datasheet, ComponentLink2URL=http://www.onsemi.com/pub_link/Collateral/NSS40201L-D.PDF, ComponentLink3Description="Package Specification", ComponentLink3URL=http://www.onsemi.cn/pub_link/Collateral/318-08.PDF, DatasheetVersion="Rev. 8", fT Min (MHz)=150, IC Continuous (A)=2, Mounting Technology="Surface Mount", PackageDescription="3-Pin Small Outline Transistor, Body 2.92 x 1.3 mm, Pitch 0.95 mm", PackageReference=SOT-23-3-318-08, PackageVersion="Rev. AP, 11/2009", Packing="Tape and Reel", PartNumber=NSS40201LT1G, Polarity=NPN, RoHS=TRUE
R1: library part CMP-2002-07753-1, Manufacturer="Yageo / Phycomp", Part Number=RC0402FR-075K1L
R2 R6: library part CMP-2001-04239-1, Manufacturer="Vishay Dale", Part Number=CRCW08055K00FKTA
R3: library part CMP-1012-00557-2, "Chip Resistor, 2.7 KOhm, +/- 1%, 0.1 W, -55 to 155 degC, 0603 (1608 Metric), RoHS, Tape and Reel", Case Code - in=0603, Case Code - mm=1608, Manufacturer=Yageo, Operating Temperature Range=-55Cto+155C, Package Description="2-Pin Surface Mount Device, Body 1.6 x 0.8 mm", Power Rating=100mW, Resistance=2.7kOhms, Temperature Coefficient=100PPM/C, Tolerance=1%, Voltage Rating=50V, Datasheet URL=http://www.yageo.com/documents/recent/PYu-RC_Group_51_RoHS_L_7.pdf, Datasheet Version="Rev. 7, 05/2017", Manufacturer URL=http://www.yageo.com/, Mounting Technology=SurfaceMount, Package Reference=0603, Packaging=Reel, Product=ThickFilmResistorsGeneralPurpose, Series=RC, Termination Style=SMD/SMT
R4 R5 R18 R25: library part CMP-2000-00435-2, "Chip Resistor, 330 Ohm, +/- 1%, 0.1 W, -55 to 155 degC, 0603 (1608 Metric), RoHS, Tape and Reel", Current Rating="500 mA", Max Operating Temperature="85 degC", Min Operating Temperature="-25 degC", Package Quantity=1500, Voltage Rating="10 V", ComponentLink1Description="Manufacturer URL", ComponentLink1URL=http://www.panasonic.com/, ComponentLink2Description=Datasheet, ComponentLink2URL=http://industrial.panasonic.com/cdbs/www-data/pdf/RDA0000/AOA0000C86.pdf, Contact Finish=Gold, Contact Material=Copper, Contact Plating=Gold, DatasheetVersion=Apr-15, Gender=Male, Height="1.45 mm", Lead Pitch="1.1 mm", Length="13.7 mm", Mating Cycles=10000, Mount="Surface Mount", PackageDescription="2-Pin Surface Mount Device, Body 1.6 x 0.85 mm", PackageReference=0603, Packaging="Tape and Reel", Pins=8, REACH SVHC="No SVHC", RoHSCompliant=true, Width="1.45 mm"
R7 R8 R9 R10: library part CMP-1012-00528-2, Manufacturer=Panasonic, Part Number=ERJ-3EKF1501V
R11 R15 R28: library part CMP-2002-06669-1, "1.5K", Manufacturer=Multicomp, Part Number="MCMR04X300 JTL"
R12: library part CMP-1012-00093-2, Manufacturer="Vishay Dale", Part Number=CRCW06036K20JNEA
R13 R16 R20 R24: library part CMP-2001-04719-1, Manufacturer="Vishay Dale", Part Number=TNPW080510R0FEEA
R14 R17 R22: library part CMP-03412-037808-1, "RES 0.1 OHM 1% 1/10W 0603", Case Code (Imperial)=0603, Case Code (Metric)=1608, Max Operating Temperature=125°C, Max Power Dissipation=100mW, Min Operating Temperature=-55°C, Package Quantity=1, Resistance=100mR, Resistance Tolerance=1%, Resistor Type="Thick Film", Temperature Coefficient=800ppm/°C, Voltage Rating=50V, Case/Package=0603, Construction=Rectangular, Contact Plating=Tin, Depth=0.8mm, Features="Moisture Resistant", Height=0.022inch, Lead Free="Lead Free", Lead Pitch=0.25mm, Length=1.6mm, Military Standard=Not, Number of Pins=2, Number of Terminations=2, Packaging="Tape and Reel", Power Rating=100mW, Radiation Hardening=No, RoHS Compliant=Yes, Series=RL, Size Code=0603, Technology="THICK FILM", Termination=SMD/SMT, Tolerance=1%, Voltage Rating (DC)=50V, Weight=7.1E-05oz, Width=0.8mm
R19: library part CMP-2000-03214-1, Manufacturer="Vishay Dale", Part Number=CRCW0603300KFKEA
R21: library part CMP-2000-00182-1, Manufacturer=Panasonic, Part Number=ERJ-3EKF1003V
R23: library part CMP-2100-03663-1, "Chip Resistor, 100 Ohm, +/- 1%, 0.1 W, -55 to 155 degC, 0603 (1608 Metric), RoHS, Tape and Reel", Case Code (Imperial)=0603, Case Code (Metric)=1608, Manufacturer=Yageo, Max Operating Temperature=155degC, Min Operating Temperature=-55degC, Package Description="2-Pin Surface Mount Device, Body 1.6 x 0.8 mm", Power Rating=100mW, Resistance=100Ohm, Temperature Coefficient=100ppm/degreesC, Tolerance=1%, Voltage Rating=50V, Case/Package=0603, Composition=ThickFilm, Datasheet URL=http://www.yageo.com/NewPortal/yageodocoutput?fileName=/pdf/R-Chip/PYu-RC_Group_51_RoHS_L_5.pdf, Datasheet Version="Rev. 5, 10/2016", Depth=0.8mm, Height=0.45mm, Lead Free=LeadFree, Length=1.6mm, Manufacturer URL=http://www.yageo.com/, Military Standard=Not, Number of Pins=2, Package Reference=0603, Packaging=TapeandReel, REACH SVHC=Unknown, RoHSCompliant=true, Termination=SMD/SMT, Voltage Rating (DC)=50V, Width=0.8mm
R26 R27 R29: library part CMP-1012-00623-3, "Chip Resistor, 10 KOhm, +/- 1%, 0.1 W, -55 to 155 degC, 0603 (1608 Metric), RoHS, Tape and Reel", Case Code (Imperial)=0603, Case Code (Metric)=1608, Manufacturer=Panasonic, Max Operating Temperature=155degC, Max Power Dissipation=100mW, Min Operating Temperature=-55degC, Package Description="2-Pin Surface Mount Device, Body 1.6 x 0.85 mm", Package Quantity=1, Package Reference=603, Resistance=10KOhm, Temperature Coefficient=100ppm\/degreesC, Tolerance=1%, Voltage Rating=75V, Case\/Package=0603, Composition=ThickFilm, Contact Plating=Tin, Datasheet URL=https://industrial.panasonic.com/cdbs/www-data/pdf/RDA0000/AOA0000C304.pdf, Datasheet Version=02/2017, Depth=0.8mm, Height=0.45mm, Lead Free=LeadFree, Length=1.6mm, Manufacturer URL=http://www.panasonic.com/, Military Standard=Not, Mount=SurfaceMount, Mounting Technology=SurfaceMount, Number of Pins=2, Number of Terminations=2, Packaging=TapeandReel, Power Rating=100mW, Radiation Hardening=No, REACH SVHC=NoSVHC, RoHSCompliant=true, Termination=SMD/SMT, Voltage Rating (DC)=75V, Width=0.031inch
U1 U4: library part CMP-04915-000006-1, "IC MTRDRV UNIPLR 0-5.5V 24HTSSOP", Ambient Temperature Range High=+125°C, Ambient Temperature Range Low=-40°C, Manufacturer="Texas Instruments", Max Junction Temp=+150°C, Max Supply Voltage=38V, Min Supply Voltage=4.5V, Nominal Supply Current=5mA, Output Current=10A, Package=PWP0024J, Switching Frequency=400kHz, Temperature="-40°C to +125°C", Automotive=Yes, Automotive Grade="Grade 1", Category=IC, ComponentLink2Description=Datasheet, ComponentLink2URL=http://www.ti.com/lit/ds/symlink/drv8873-q1.pdf, Device Class L1="Integrated Circuits (ICs)", Device Class L2="Power Management ICs", Device Class L3="Motor Drivers", Digikey Description="IC MTRDRV UNIPLR 0-5.5V 24HTSSOP", Height=1.2mm, Ipc Land Pattern Name=SOP65P640X120-24, Lead Free=Yes, Manufacturer Part Number=DRV8873HPWPRQ1, Motor Type=Brushed, Mouser Description="Automotive H-Bridge Motor Driver 24-HTSSOP -40 to 125", Number Of Outputs=2, Octopart=https://octopart.com/drv8873hpwprq1-texas+instruments-94502234, RoHS=TRUE, Standoff Height=0.05mm, Temperature Range High=+125°C, Temperature Range Low=-40°C
U2 U5: library part CMP-2000-04924-1, "Single-Chip USB to URAT Bridge, 3.3 V, -40 to 85 degC, 28-Pin QFN, RoHS, Tape and Reel", Manufacturer="Silicon Labs", Operating Supply Voltage (Max)=3.6V, Operating Supply Voltage (Min)=3V, Operating Supply Voltage (Typ)=3.3V, Operating Temperature (Max)=85C, Operating Temperature (Min)=-40C, Operating Temperature Classification=Industrial, Package Description="28-Pin Quad-Flat No-Leads Package, Body 5 x 5 mm, Pitch 0.5 mm", Package Reference=QFN-28, Package Type=QFNEP, Supply Current=26mA, Data Rate=1000kbps, Datasheet URL=http://www.mouser.com/ds/2/368/CP2102-9-247052.pdf, Datasheet Version="Rev. 1.6, 12/2013", Interface Circuit Standard 1=RS-232, Manufacturer URL=http://www.silabs.com/, Mounting=SurfaceMount, Number of Channels=1, Package URL=http://www.silabs.com/Support%20Documents/TechnicalDocs/C8051T61x.pdf, Packaging=TapeandReel, Pin Count=28, Rad Hardened=No, Transmitter and Receiver FIFO Counter=No
U3: "High Efficiency 1.2MHz2A Step Up Converter", Package=Package, Availability="Not in stock", Check_prices=https://www.snapeda.com/parts/MT3608/Aerosemi+Technology+Co.%252C+Ltd/view-part/?ref=eda, MF="Aerosemi Technology Co., Ltd", MP=MT3608, Price=None, SnapEDA_Link=https://www.snapeda.com/parts/MT3608/Aerosemi+Technology+Co.%252C+Ltd/view-part/?ref=snap
U6: library part CMP-0133-00131-2, "IC LI-ION/LI-POLY CTRLR 10-DFN", Case/Package=DFN, Drain to Source Resistance=350mR, Max Charge Current=1.1A, Max Input Voltage=18V, Max Operating Temperature=85°C, Max Output Voltage=8.85V, Max Supply Voltage=13V, Min Operating Temperature=-40°C, Min Output Voltage=8.15V, Min Supply Voltage=4.2V, Operating Supply Current=700uA, Output Voltage=8.4V, Package Quantity=120, Height=0.037inch, Lead Free="Lead Free", Length=0.118inch, Max Output Current=1.1A, Mount="Surface Mount", Number of Cells=2, Number of Channels=2, Number of Pins=10, Packaging=Rail/Tube, Radiation Hardening=No, REACH SVHC="No SVHC", Voltage Rating=8.85V, Width=0.118inch
U7 U9: library part CMP-0704-00041-3, "IC CURRENT MONITOR 1% SOT23-8", Case/Package=SOT-23-8, Input Offset Voltage (Vos)=100uV, Max Input Voltage=26V, Max Operating Temperature=125°C, Max Supply Current=5mA, Max Supply Voltage=5.5V, Min Input Voltage=0V, Min Operating Temperature=-40°C, Min Supply Voltage=3V, Nominal Supply Current=700uA, Operating Supply Current=1mA, Output Current=10mA, Package Quantity=3000, Accuracy=1%, Bandwidth=3.4MHz, Common Mode Rejection Ratio=100dB, Contact Plating=Gold, Features=I²C, Height=1.3mm, Lead Free="Lead Free", Length=3mm, Number of Amplifiers=1, Number of Pins=8, Output Current per Channel=10mA, Output Type=Digital, Packaging="Tape and Reel", Quiescent Current=700uA, Radiation Hardening=No, REACH SVHC="No SVHC", RoHS Compliant=Yes, Series=Zero-Drift, Supply Current=700uA, Weight=0.001411oz, Width=1.75mm
U8: library part CMP-0063-01233-4, "IC REG BOOST ADJ 2.2A 8VSSOP", Case/Package=MSOP, Max Input Voltage=14V, Max Operating Temperature=85°C, Max Output Current=2A, Min Input Voltage=800mV, Min Operating Temperature=-40°C, Min Output Voltage=1.24V, Nominal Supply Current=16mA, Output Power=500mW, Package Quantity=1000, Quiescent Current=80uA, Switching Frequency=2MHz, Efficiency=87%, Height=0.86mm, Lead Free="Lead Free", Length=3mm, Max Output Voltage=14V, Min Supply Voltage=800mV, Mount="Surface Mount", Number Of Outputs=1, Number of Pins=8, Output Configuration=Positive, Output Current=2A, Output Type=Adjustable, Output Voltage=14V, Packaging="Tape and Reel", Radiation Hardening=No, REACH SVHC="No SVHC", Series=-, Synchronous Rectifier=No, Topology=Boost, Weight=0.004938oz, Width=3.1mm
U10: library part LD1117, "IC REG LINEAR 3.3V 800MA SOT223", Case/Package=SOT-223, Dropout Voltage=1.1V, Input Bias Current=5mA, Max Input Voltage=15V, Max Operating Temperature=125°C, Max Output Current=1.3A, Max Output Voltage=3.3V, Max Power Dissipation=12W, Min Input Voltage=5.3V, Min Operating Temperature=-40°C, Output Current=950mA, Output Voltage Accuracy=1%, Package Quantity=1, Quiescent Current=10mA, Accuracy=1%, Contact Plating=Tin, Height=1.8mm, Lead Free="Lead Free", Length=6.5mm, Max Supply Voltage=15V, Min Output Voltage=3.3V, Min Supply Voltage=3.3V, Mount="Surface Mount", Nominal Output Voltage=3.3V, Number Of Outputs=1, Number of Pins=4, Number of Regulators=1, Number of Terminals=4, Output Type=Fixed, Output Voltage=3.3V, Packaging="Tape and Reel", Polarity=Positive, Power Dissipation=12W, Radiation Hardening=No, REACH SVHC="No SVHC", Termination=SMD/SMT, Weight=0.01lb, Width=3.5mm
U11: library part "25pin connector", "25PIN, FH26-25S-0.3SHW0(05). PITCH3MM"
U12: library part CMP-0237-00207-3, "ARM Cortex-M3 32-bit MCU, 256 KB Flash, 48 KB Internal RAM, 51 I/Os, 64-pin LQFP, -40 to 105 degC, Tray", I/Os (High Current)=51, Operating Frequency(F) (Processor speed) (MHz)=72, Supply Voltage(Vcc) min (V)=2, A/D Converter="3x12-bit (16 Channel)", ComponentLink1Description="Manufacturer URL", ComponentLink1URL=http://www.st.com/web/en/home.html, ComponentLink2Description=Datasheet, ComponentLink2URL=http://www.st.com/st-web-ui/static/active/en/resource/technical/document/datasheet/CD00191185.pdf, ComponentLink3Description="Package Specification", ComponentLink3URL=http://www.st.com/st-web-ui/static/active/en/resource/technical/document/datasheet/DM00037051.pdf, Core="ARM Cortex-M3", D/A Converter="2x12-bit (2 Channel)", DatasheetVersion="Rev. 8", FLASH Size (Prog) (kB)=256, Internal RAM Size (kB)=48, Mounting Technology="Surface Mount", PackageDescription="64-Pin Low Profile Quad Flat Package, 10 x 10 mm Body, 0.5 mm Pitch", PackageReference=LQFP64, PackageVersion="Rev. 4, 06/2013", Packing=Tray, PartNumber=STM32F103RCT7
Y1: library part CMP-2000-05033-2, "Crystal 8MHz ±20ppm 18pF SMD-2 5mm x 3.2mm", Case/Package=CSMD, ESR (Equivalent Series Resistance)=140R, Frequency=8MHz, Frequency Stability=30ppm, Frequency Tolerance=20ppm, Load Capacitance=18pF, Max Operating Temperature=85°C, Min Operating Temperature=-40°C, Package Quantity=1000, Resistor Type=Ceramic, Series Resistance=500R, Depth=3.2mm, Height=0.051inch, Lead Free="Lead Free", Length=5mm, Mount="Surface Mount", Number of Pins=2, Packaging="Tape and Reel", Radiation Hardening=No, RoHS Compliant=Yes, Termination=SMD/SMT, Tolerance=20ppm, Width=3.2mm
Y2: library part CMP-27762-013665-1, "Crystal 32MHz ±20ppm 18pF SMD-2 6mm x 3.5mm", Case/Package=CSMD, ESR (Equivalent Series Resistance)=50R, Frequency=32MHz, Frequency Stability=30ppm, Frequency Tolerance=20ppm, Load Capacitance=18pF, Max Operating Temperature=85°C, Min Operating Temperature=-40°C, Operating Frequency="32 MHz", Package Quantity=1000, Resistor Type=Ceramic, Depth=3.5mm, Height=0.055inch, Lead Free="Lead Free", Length=6mm, Mount="Surface Mount", Number of Pins=2, Packaging="Tape and Reel", Radiation Hardening=No, Series=ABM7, Series Resistance=50R, Termination=SMD/SMT, Tolerance=20ppm, Width=3.3mm

## Via types
v1: diameter 0.6, hole 0.3, Top Layer to Bottom Layer, 54 vias
v2: diameter 0.8, hole 0.4, Top Layer to Bottom Layer, 19 vias
v3: diameter 0.5, hole 0.2, Top Layer to Bottom Layer, 18 vias

## Nets (pads, with @x,y where several pads share a name; then routed paths per layer and width w, separated by ;. In a path a pad name is that pad's centre, name@x,y a point inside that pad or via, vN(x,y) a via of type N, cw(c..) or ccw(c..) an arc to the next point about the centre after c; other vN are vias at no path point)
+3V3: C11.1 C12.1 C21.2 C22.2 C23.2 C24.2 J4.1 J5.1 J7.4 R2.1 R25.2 R28.2 U2.6 U10.2 U10.4 U11.4 U11.5 | length 1.5
  Top Layer w0.3: 39.551,25.411 40.966,25.411 R2.1@41.021,25.466
+5V: C9.2 C10.2 C13.2 C18.2 C20.2 D4.C J1.5 J2.1 J3.5 R11.2 R18.2 R19.2 U1.7 U1.11 U2.7 U2.8 U4.7 U4.11 U6.1 U6.2 U7.4 U7.8 U8.2 U8.6 U8.7 U9.4 U9.7 U10.3 | length 39.9
  Top Layer w0.3: v1(74.93,11.684) 76.835,11.684 v1(78.74,13.589)
  Bottom Layer w0.2: R11.2 C13.2
  Bottom Layer w0.3: v1(74.676,30.861) 75.819,32.004 75.819,32.717 75.995,32.893 79.453,32.893 79.629,32.717 79.629,31.039 U7.8 78.77,29.629 78.224,29.083 77.011,29.083 76.835,28.907 76.835,27.994 U7.4 ; U9.4 76.708,9.936 76.708,10.746 77.011,11.049 77.487,11.049 77.978,11.54 U9.7 77.978,12.657 78.683,13.362 78.683,13.532 v1(78.74,13.589)
  Bottom Layer w0.5: D4.C 33.782,21.986 34.307,21.461 35.307,21.461 35.94,20.828 36.029,20.828 36.322,20.535 36.322,17.399 35.941,17.018 34.29,17.018 33.147,15.875 33.147,13.609 33.44,13.316 C13.2 ; 34.906,13.316 35.742,14.152 U6.1 U6.2
+12V: C3.2 C4.2 C5.2 D1.C R1.2 U1.13 U1.20 U4.13 U4.20
/CS: U11.7 U12.9
/RD: U11.10 U12.55
/WR: U11.11 U12.11
buzzer: R23.1 U12.38
DB0: U11.20 U12.23
DB1: U11.19 U12.22
DB2: U11.18 U12.21
DB3: U11.17 U12.20
DB4: U11.16 U12.17
DB5: U11.15 U12.16
DB6: U11.14 U12.15
DB7: U11.13 U12.14
FMARK: U11.6 U12.29
GND: C1.2 C2.2 C4.1 C6.1 C9.1 C10.1 C11.2 C12.2 C13.1 C14.1 C16.1 C18.1 C20.1 C21.1 C23.1 C24.1 C25.2 C26.2 C27.1 C28.1 DS1.2 J1.2 J2.4 J3.2 J4.5 J5.5 J7.1 P1.2 Q1.2 R3.1 R6.2 R7.1 R8.1 R9.1 R10.1 R12.1 R21.1 R27.2 R29.1 U1.8 U1.9 U1.16 U1.17 U1.24 U2.3 U2.29 U3.2 U4.8 U4.9 U4.16 U4.17 U4.24 U5.10 U5.13 U5.14 U5.15 U5.16 U5.17 U5.18 U5.19 U5.20 U5.21 U5.22 U6.8 U6.9 U7.3 U7.7 U8.1 U8.5 U9.3 U9.8 U10.1 U11.3 U11.12 U11.21 | length 30.5
  Top Layer w0.2: v2(37.211,9.525) 37.236,9.525 39.03,11.319 40.28,11.319 ; v2(46.99,11.557) 46.991,11.556 46.991,9.988 46.992,9.987 ; 68.707,11.542 68.707,12.192 ; 73.071,5.636 77.518,5.636 79.248,7.366 v1(79.248,11.938)
  Bottom Layer w0.2: C13.1 34.594,14.116 36.226,15.748 C14.1 ; R10.1@36.67,9.779 36.711,9.82 U6.9 U6.8 ; C16.1 42.961,16.134 45.501,16.134 C18.1 ; U9.3 77.328,10.395 77.853,10.92 78.992,10.92 79.248,11.176 v1(79.248,11.938) 78.746,11.938 78.628,12.056 U9.8
  other v3: 19.361,11.473 20.461,11.473 21.561,11.473 19.361,12.573 20.461,12.573 21.561,12.573 19.361,13.673 20.461,13.673 21.561,13.673
hall1: J1.3
hall2: J1.4 U12.45
hall5: J3.3 U12.41
hall6: J3.4 U12.39
INT_301021: J4.4 U12.62
INT_301022: J5.4 U12.61
JTCK-SWCLK: J7.2 R29.2 U12.49
JTMS-SWDIO: J7.3 R26.1 U12.46
LED_A: U11.2 U12.28
LED_K: U11.1 U12.8
max_en: U12.56
MCU_RX: R5.1 U12.43
MCU_TX: R4.1 U12.42
NetC1_1: C1.1 U1.1
NetC2_1: C2.1 U4.1
NetC3_1: C3.1 U1.21
NetC5_1: C5.1 U4.21
NetC7_1: C7.1 U1.22
NetC7_2: C7.2 U1.23
NetC8_1: C8.1 U4.22
NetC8_2: C8.2 U4.23
NetC15_1: C15.1 R16.2 U7.2
NetC15_2: C15.2 R13.2 U7.1
NetC17_1: C17.1 D4.A L2.2 U8.8 | length 11.5